# Altium PCB Copy of TQ210_BOARD_V4-20121031.PcbDoc (part 2 of 8)
Units mm, origin at the board's own origin, x right, y up, seen from the top; angles counter-clockwise.
Board outline 191.2 x 131.27 mm, 2 copper layers (TopLayer, BottomLayer); 362 components, 455 nets, 1594 pads, 630 vias.
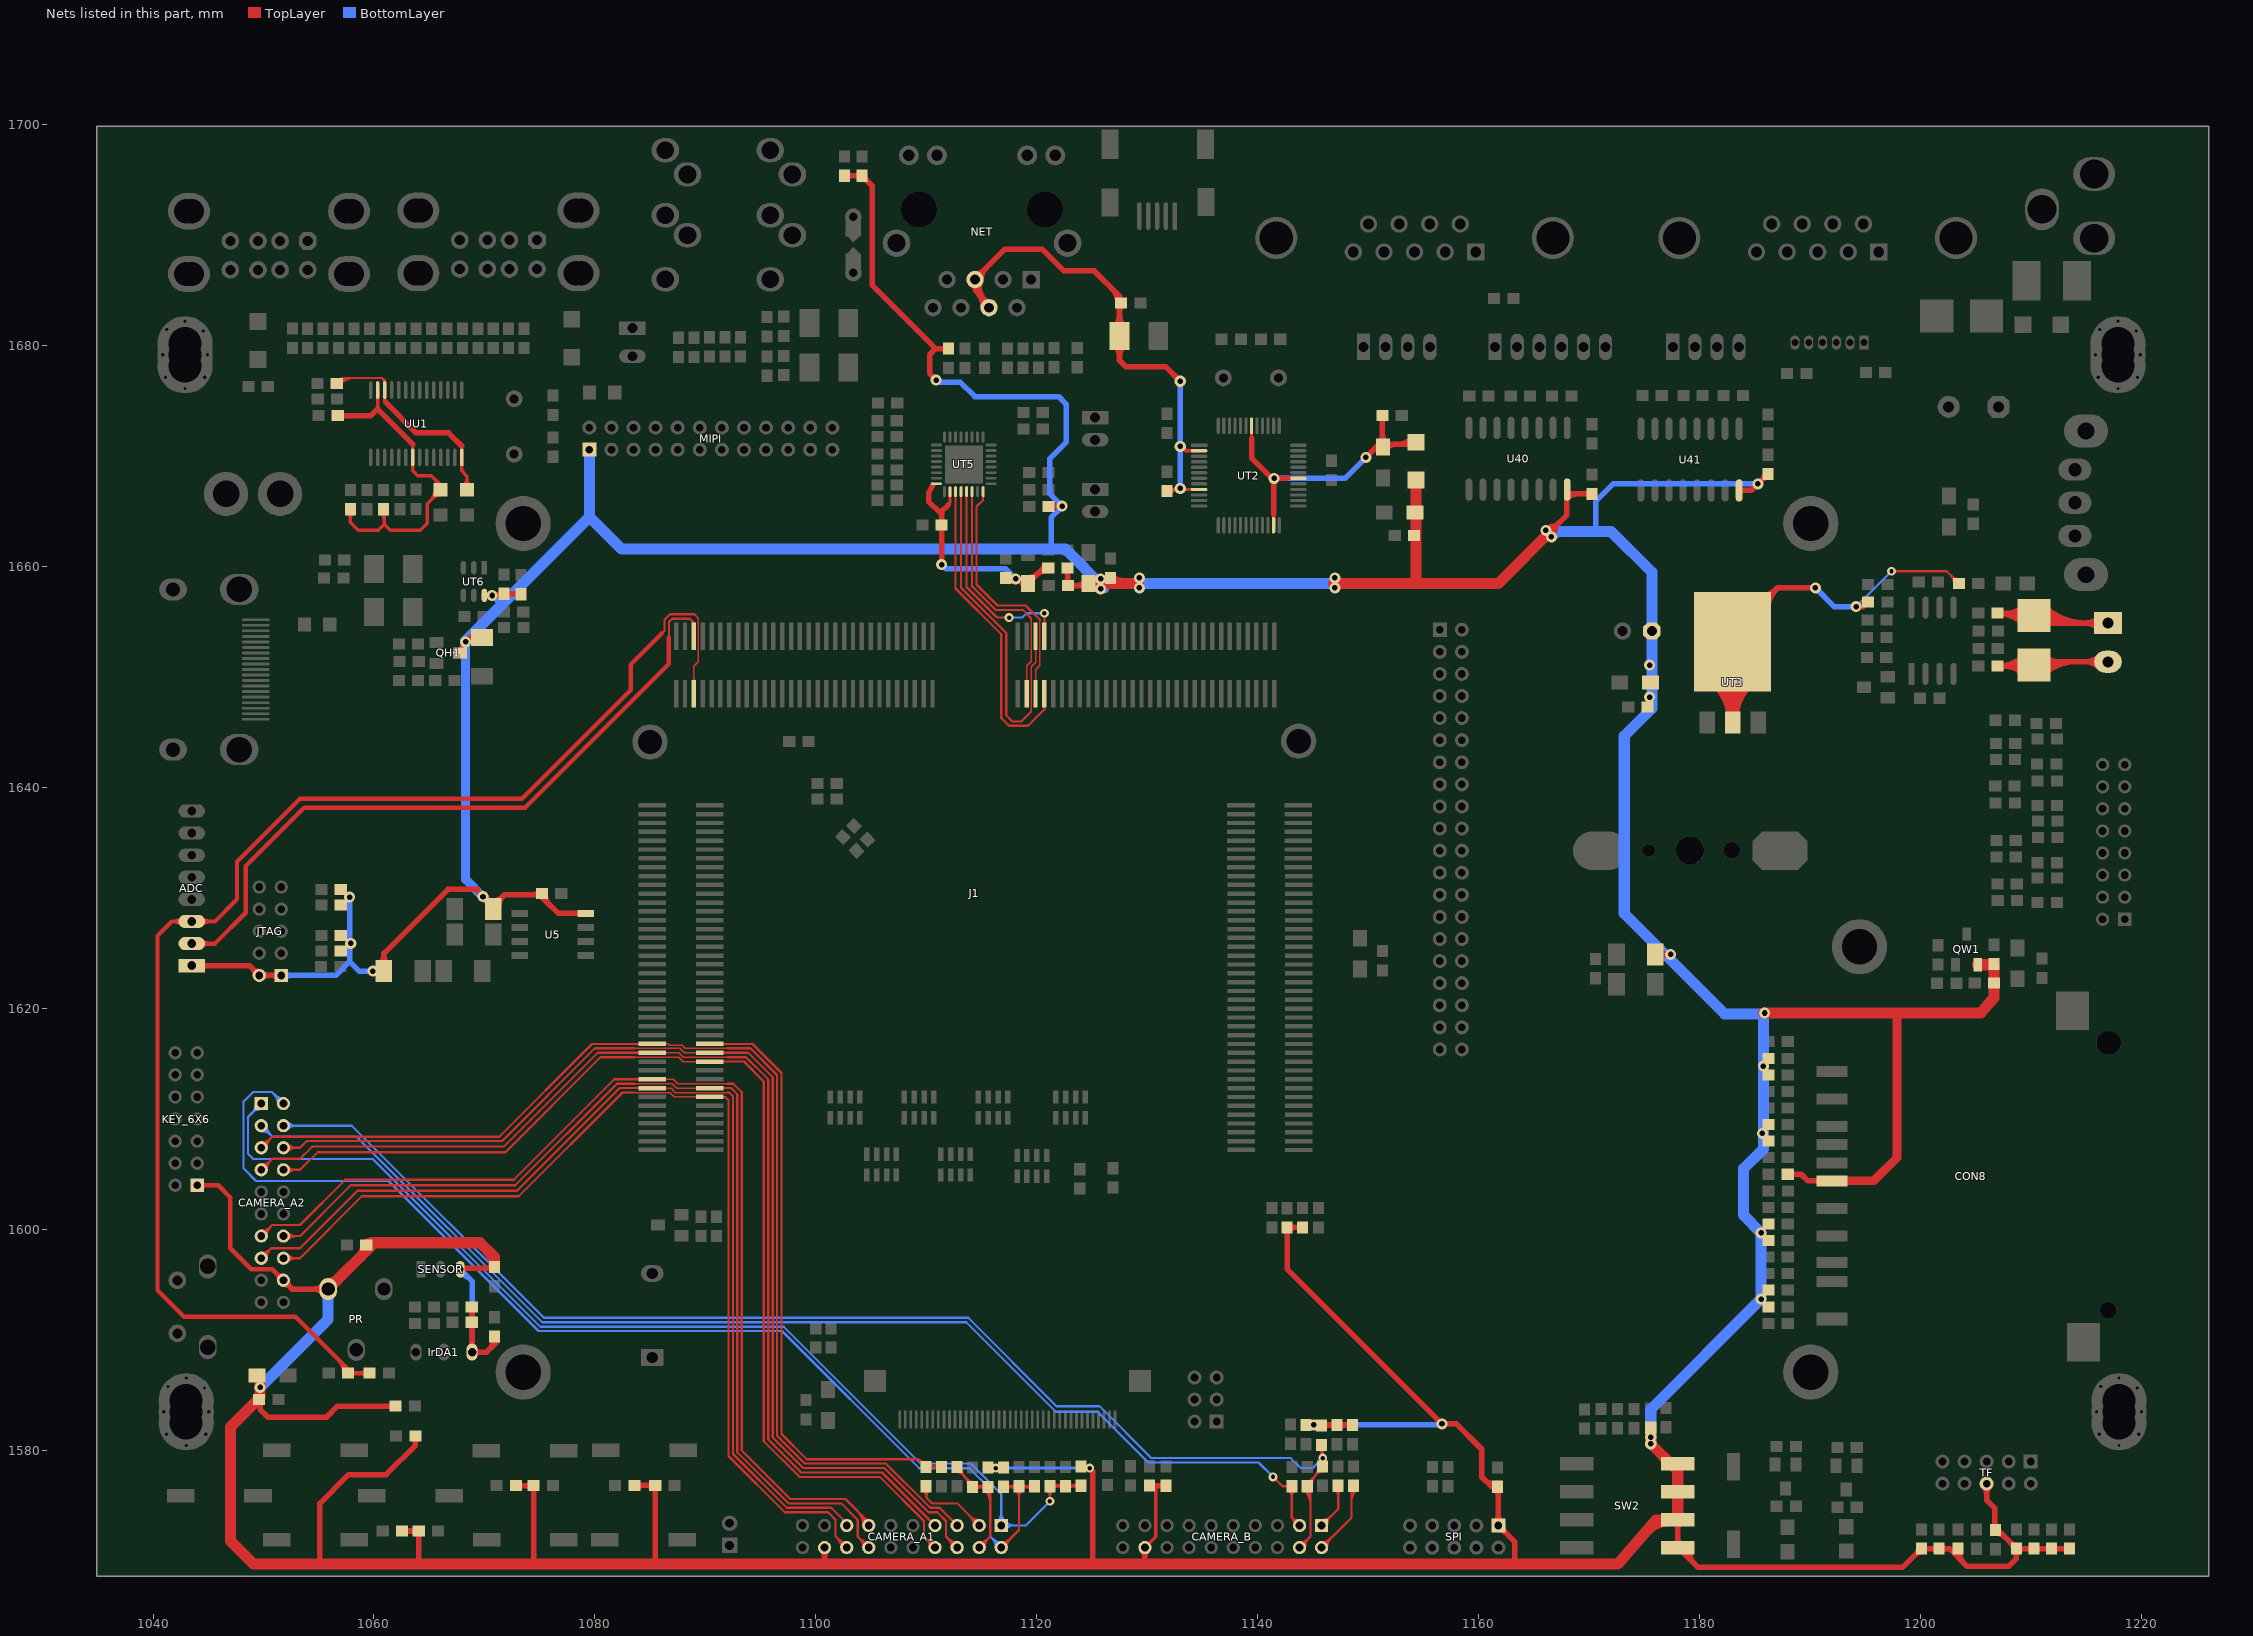
[diagram p2: the nets of this part, all layers, seen from the top]

## Via types
v1: diameter 1, hole 0.5, TopLayer to BottomLayer, 458 vias
v2: diameter 0.8, hole 0.4, TopLayer to BottomLayer, 172 vias

## Nets (pads, with @x,y where several pads share a name; then routed paths per layer and width w, separated by ;. In a path a pad name is that pad's centre, name@x,y a point inside that pad or via, vN(x,y) a via of type N, cw(c..) or ccw(c..) an arc to the next point about the centre after c; other vN are vias at no path point)
1V8_HUB: CU1.1 CU3.2 UU1.12 UU1.28 | length 25.5
  TopLayer w0.2: CU3.2@1056.54,1676.743 cw(c1057.406,1675.877) 1057.406,1677.102 ; CU3.2@1056.631,1676.602 1057.132,1677.102 1060.73,1677.102 1060.965,1676.867 ; CU3.2@1056.681,1676.602 cw(c1057.889,1675.395) 1057.889,1677.102 ; CU3.2@1056.823,1676.46 cw(c1058.372,1674.912) 1058.372,1677.102 ; 1060.726,1677.105 cw(c1060.271,1676.65) UU1.12@1060.915,1676.65 ; 1060.959,1674.943 1060.965,1674.949
  TopLayer w0.3: 1060.965,1674.949 UU1.12@1060.965,1676 1060.965,1676.867 ; 1067.95,1668.688 1068.419,1668.219 CU1.1@1068.419,1666.973 ; UU1.28@1067.95,1669.904 1067.95,1670.949 ; CU1.1@1068.1,1667.291 ccw(c1067.332,1668.059) 1068.419,1668.059 ccw(c1069.505,1668.059) CU1.1@1068.737,1667.291
  TopLayer w0.33: 1067.95,1668.688 UU1.28@1067.95,1669.904
  TopLayer w0.5: 1061.06,1674.917 1063.795,1672.131 1066.767,1672.131 1067.95,1670.949
3V3_HUB: CU2.1 CU5.1 RU18.2 RU19.2 UU1.13 UU1.21 | length 36.1
  TopLayer w0.3: RU18.2@1057.618,1664.911 cw(c1057.02,1664.313) 1057.865,1664.313 cw(c1058.71,1664.313) RU18.2@1058.112,1664.911 ; RU18.2@1057.865,1665.208 1057.865,1664.041 1058.596,1663.31 1060.374,1663.31 1060.933,1663.868 ; 1060.33,1674.289 UU1.13@1060.33,1676 ; RU19.2@1060.618,1664.911 cw(c1059.855,1664.148) 1060.933,1664.148 ; 1060.933,1664.478 cw(c1061.545,1664.478) RU19.2@1061.112,1664.911 ; RU19.2@1060.933,1665.316 1060.933,1663.868 ; 1063.505,1671.114 1063.505,1668.695 1063.95,1668.25 1065.2,1668.25 CU5.1@1065.95,1667.5 ; 1065.111,1665.996 ccw(c1064.13,1666.978) CU5.1@1065.518,1666.978 ; 1065.413,1666.298 cw(c1065.968,1665.743) CU5.1@1065.968,1666.528 ; 1065.421,1668.029 cw(c1064.457,1667.065) CU5.1@1065.818,1666.986 ; CU5.1@1066.056,1666.942 1064.828,1665.714 1064.828,1663.945 1064.193,1663.31 1061.492,1663.31 1060.933,1663.868
  TopLayer w0.5: CU2.1@1056.651,1673.657 1059.698,1673.657 1060.33,1674.289 1063.505,1671.114 ; CU2.1@1056.945,1673.521 cw(c1057.273,1673.194) 1057.273,1673.657 ; CU2.1@1056.945,1673.875 ccw(c1057.471,1674.401) 1057.471,1673.657
3V3_IO: ADC.1 C1.1 C3.1 C5.1 C6.1 C8.1 C9.1 C10.1 C11.1 C12.1 C15.1 C17.1 C111.1 C201.1 C202.1 C403.1 C413.1 C501.1 C517.1 C518.1 CAMERA_A1.18 CAMERA_A2.18 CAMERA_B.18 CM1.1 CM3.1 CMB1.1 CON8.4 D2.1 D3.1 D5.2 D7.2 IrDA1.3 JTAG.1 JTAG.2 KEY_6X6.1 L201.1 L421.1 L501.1 L503.2 L507.2 MIPI.1 PR.3 QH1.C QW1.2 R1.2 R2.2 R3.2 R4.2 R5.2 R6.2 R7.2 R8.2 R33.1 R61.1 R62.1 R63.1 R64.1 R210.1 R211.1 R331.1 RA3.2 RA5.2 RD1.1 RD2.1 RD3.1 RD4.1 RD5.1 RD6.1 RD7.1 RM19.1 RM20.1 RM23.1 RMB19.1 RMB20.1 RMB23.2 RO7.2 RO8.2 RS1.1 RS2.1 RS3.1 RS4.1 RS5.1 RS6.1 RS7.1 RS8.1 RT2.2 RT61.2 RW20.1 RW21.2 SENSOR.3 SPI.1 SW2.5 SW2.6 SW2.7 SW2.8 TF.6 U5.8 U40.16 U41.16 UT3.2 UT3.4 UT6.6 | length 1041.7
  TopLayer w0.2: v2(1197.4,1659.6) 1202.403,1659.6 R331.1@1203.498,1658.505 ; 1202.73,1659.274 cw(c1201.962,1658.505) R331.1@1203.048,1658.505 ; 1202.851,1659.153 ccw(c1203.448,1659.75) R331.1@1203.448,1658.905 ; R331.1@1203.071,1658.932 cw(c1202.645,1658.505) R331.1@1203.248,1658.505
  TopLayer w0.3: KEY_6X6.1@1044.318,1603.682 cw(c1045.086,1602.914) 1045.086,1604 cw(c1045.086,1605.086) KEY_6X6.1@1044.318,1604.318 ; CAMERA_A2.18@1051.35,1595.4 ccw(c1050.264,1595.4) 1051.032,1596.168 ccw(c1051.8,1596.936) CAMERA_A2.18@1051.8,1595.85 ; CAMERA_B.18@1129.8,1571.2 1130.783,1572.183 1130.783,1576.8
  TopLayer w0.4: KEY_6X6.1@1044,1604 1045.9,1604 1047,1602.9 1047,1598.3 1048.9,1596.4 1050.7,1596.4 ; 1050.8,1596.4 CAMERA_A2.18@1051.8,1595.4
  TopLayer w0.5: ADC.1@1043.502,1623.888 1048.728,1623.888 JTAG.2@1049.612,1623.004 ; ADC.1@1044.349,1623.64 cw(c1044.947,1623.043) 1044.947,1623.888 cw(c1044.947,1624.733) ADC.1@1044.349,1624.135 ; JTAG.2@1049.262,1623.004 ccw(c1048.417,1623.004) 1049.015,1623.601 ccw(c1049.612,1624.199) JTAG.2@1049.612,1623.354 ; C5.1@1049.473,1584.423 cw(c1048.926,1583.876) 1049.7,1583.876 ; JTAG.2@1049.612,1623 JTAG.1@1051.7,1623 ; C5.1@1049.7,1584.8 1049.7,1583.7 1050.4,1583 1055.7,1583 1056.711,1584.011 R3.2@1061.992,1584.011 ; JTAG.2@1049.859,1622.756 cw(c1050.448,1622.167) 1050.448,1623 ; JTAG.2@1049.859,1623.251 ccw(c1050.466,1623.857) 1050.466,1623 ; 1050.758,1623 ccw(c1050.758,1623.857) JTAG.1@1051.365,1623.251 ; 1050.776,1623 cw(c1050.776,1622.167) JTAG.1@1051.365,1622.756 ; CAMERA_A2.18@1051.8,1595.05 cw(c1051.8,1594.205) 1052.397,1594.803 cw(c1052.995,1595.4) CAMERA_A2.18@1052.15,1595.4 ; CAMERA_A2.18@1051.8,1595.4 1052.6,1594.6 PR.3@1055.852,1594.6 ; 1055.1,1569.7 1055.1,1575.2 1057.7,1577.8 1061.1,1577.8 1063.75,1580.45 R1.2@1063.75,1581.3 ; PR.3@1055.463,1594.211 ccw(c1054.524,1593.272) 1054.524,1594.6 ccw(c1054.524,1595.928) PR.3@1055.463,1594.989 ; D5.2@1060.546,1624.004 ccw(c1059.693,1624.857) 1060.9,1624.857 ccw(c1062.107,1624.857) D5.2@1061.254,1624.004 ; D5.2@1060.9,1623.4 1060.9,1625 1066.7,1630.8 1069.3,1630.8 1070.8,1629.3 1071.8,1630.3 1075,1630.3 1076.688,1628.612 U5.8@1079.194,1628.612 ; 1061.27,1584.011 cw(c1061.27,1583.37) R3.2@1061.723,1583.823 ; 1061.323,1584.011 ccw(c1061.323,1584.577) R3.2@1061.723,1584.177 ; R2.2@1062.55,1572.7 R4.2@1064.05,1572.7 1064.05,1569.7 ; R2.2@1062.777,1572.523 cw(c1063.204,1572.096) 1063.204,1572.7 cw(c1063.204,1573.304) R2.2@1062.777,1572.877 ; R1.2@1063.573,1581.123 cw(c1063.146,1580.696) 1063.75,1580.696 cw(c1064.354,1580.696) R1.2@1063.927,1581.123 ; R4.2@1063.823,1572.523 ccw(c1063.396,1572.096) 1063.396,1572.7 ccw(c1063.396,1573.304) R4.2@1063.823,1572.877 ; R4.2@1063.873,1572.523 cw(c1063.446,1572.096) 1064.05,1572.096 cw(c1064.654,1572.096) R4.2@1064.227,1572.523 ; QH1.C@1067.782,1652.401 ccw(c1067.376,1653) v1@1068.1,1653 ; SENSOR.3@1067.808,1596.4 1067.908,1596.5 1070.145,1596.5 ; SENSOR.3@1067.914,1596.294 cw(c1068.412,1595.796) 1068.412,1596.5 ; QH1.C@1068.1,1652.1 v1@1068.1,1653 ; v1@1068.275,1653.175 cw(c1068.775,1652.675) D2.1@1069.229,1653.217 ; v1@1068.334,1653.234 cw(c1069.283,1652.284) 1069.55,1653.6 ccw(c1069.127,1653.095) 1068.661,1653.561 ; IrDA1.3@1068.698,1589.336 ccw(c1068.257,1589.777) 1068.88,1589.777 ccw(c1069.503,1589.777) IrDA1.3@1069.062,1589.336 ; RA3.2@1068.723,1591.423 cw(c1068.345,1591.045) 1068.88,1591.045 ; RA3.2@1068.723,1591.777 ccw(c1068.345,1592.155) 1068.88,1592.155 ; RA5.2@1068.723,1592.823 cw(c1068.345,1592.445) 1068.88,1592.445 ; RA5.2@1068.85,1593 1068.88,1592.97 IrDA1.3@1068.88,1588.9 ; 1068.88,1590.948 cw(c1069.552,1590.948) RA3.2@1069.077,1591.423 ; 1068.88,1592.252 ccw(c1069.552,1592.252) RA3.2@1069.077,1591.777 ; 1068.88,1592.348 cw(c1069.552,1592.348) RA5.2@1069.077,1592.823 ; IrDA1.3@1069,1588.9 1070.2,1588.9 1070.9,1589.6 CM1.1@1070.9,1590.3 ; IrDA1.3@1069.062,1588.718 cw(c1069.503,1588.277) 1069.503,1588.9 cw(c1069.503,1589.523) IrDA1.3@1069.062,1589.082 ; D2.1@1069.113,1653.357 ccw(c1068.7,1653.128) 1068.7,1653.6 ; D2.1@1069.113,1653.843 cw(c1068.7,1654.072) 1068.7,1653.6 ; D2.1@1069.8,1653.6 1068.7,1653.6 ; v1@1069.911,1630.189 cw(c1068.972,1629.25) D7.2@1070.3,1629.25 ; UT6.6@1069.995,1657.412 RT61.2@1071.588,1657.412 ; v1@1070.032,1630.068 ccw(c1070.8,1630.836) 1070.8,1629.75 ccw(c1070.8,1630.836) 1071.568,1630.068 ; 1070.525,1589.225 ccw(c1069.963,1589.787) CM1.1@1070.676,1590.139 ; C501.1@1070.6,1596.4 C501.1@1070.7,1596.3 ; CM1.1@1070.723,1590.073 cw(c1070.296,1589.646) 1070.9,1589.646 cw(c1071.504,1589.646) CM1.1@1071.077,1590.073 ; v1@1070.948,1657.412 ccw(c1070.948,1658.35) RT61.2@1071.612,1657.687 ; 1071.018,1589.718 ccw(c1070.623,1590.113) CM1.1@1071.124,1590.361 ; D7.2@1071.3,1629.25 cw(c1072.628,1629.25) 1071.689,1630.189 ; RT61.2@1071.789,1657.56 CM3.1@1073.253,1657.56 ; RT61.2@1071.965,1657.383 cw(c1072.392,1656.956) 1072.392,1657.56 cw(c1072.392,1658.164) RT61.2@1071.965,1657.737 ; 1072.697,1657.56 ccw(c1072.697,1658.166) CM3.1@1073.125,1657.737 ; 1072.7,1657.56 cw(c1072.7,1656.959) CM3.1@1073.125,1657.384 ; R5.2@1072.85,1576.8 R6.2@1074.45,1576.8 1074.45,1569.7 ; R5.2@1073.077,1576.623 cw(c1073.504,1576.196) 1073.504,1576.8 cw(c1073.504,1577.404) R5.2@1073.077,1576.977 ; R6.2@1074.223,1576.623 ccw(c1073.796,1576.196) 1073.796,1576.8 ccw(c1073.796,1577.404) R6.2@1074.223,1576.977 ; R6.2@1074.273,1576.623 cw(c1073.846,1576.196) 1074.45,1576.196 cw(c1075.054,1576.196) R6.2@1074.627,1576.623 ; 1074.305,1630.3 ccw(c1074.305,1631.245) C9.1@1074.973,1630.577 ; C9.1@1075.5,1630.4 ccw(c1076.949,1630.4) 1075.924,1629.376 ; R7.2@1083.574,1576.824 R8.2@1085.474,1576.824 1085.474,1569.7 ; R7.2@1083.801,1576.647 cw(c1084.228,1576.22) 1084.228,1576.824 cw(c1084.228,1577.428) R7.2@1083.801,1577.001 ; R8.2@1085.247,1576.647 ccw(c1084.82,1576.22) 1084.82,1576.824 ccw(c1084.82,1577.428) R8.2@1085.247,1577.001 ; R8.2@1085.297,1576.647 cw(c1084.87,1576.22) 1085.474,1576.22 cw(c1086.078,1576.22) R8.2@1085.651,1576.647 ; CAMERA_A1.18@1100.553,1570.953 cw(c1099.955,1570.355) 1100.8,1570.355 cw(c1101.645,1570.355) CAMERA_A1.18@1101.047,1570.953 ; 1100.8,1569.9 CAMERA_A1.18@1100.8,1571.2 ; R210.1@1102.6,1695.4 R211.1@1103.9,1695.4 ; R210.1@1102.777,1695.223 cw(c1103.204,1694.796) 1103.204,1695.4 cw(c1103.204,1696.004) R210.1@1102.777,1695.577 ; R211.1@1104.023,1695.223 ccw(c1103.596,1694.796) 1103.596,1695.4 ccw(c1103.596,1696.004) R211.1@1104.023,1695.577 ; R211.1@1104.2,1695.1 cw(c1104.2,1694.376) 1104.712,1694.888 ; R211.1@1104.2,1695.4 1105.1,1694.5 1105.1,1685.5 1110.85,1679.75 ; R211.1@1104.45,1695.35 ccw(c1104.933,1695.35) R211.1@1104.591,1695.009 ; v1(1110.9,1676.9) 1110.3,1677.5 1110.3,1679.2 1110.85,1679.75 ; L503.2@1111.823,1679.573 ccw(c1111.396,1679.146) 1111.396,1679.75 ccw(c1111.396,1680.354) L503.2@1111.823,1679.927 ; L503.2@1112,1679.75 1110.85,1679.75 ; L507.2@1121.078,1665.476 v1@1122.324,1665.476 ; L507.2@1121.305,1665.299 cw(c1121.731,1664.872) 1121.731,1665.476 cw(c1121.731,1666.08) L507.2@1121.305,1665.653 ; RT2.2@1122.623,1658.477 ccw(c1122.196,1658.904) 1122.8,1658.904 ccw(c1123.404,1658.904) RT2.2@1122.977,1658.477 ; L501.1@1122.623,1659.723 cw(c1122.196,1659.296) 1122.8,1659.296 cw(c1123.404,1659.296) L501.1@1122.977,1659.723 ; RT2.2@1122.8,1658.35 L501.1@1122.8,1659.9 ; RT2.2@1122.85,1658.3 C517.1@1124.7,1658.3 ; RT2.2@1123.077,1658.123 cw(c1123.504,1657.696) 1123.504,1658.3 cw(c1123.504,1658.904) RT2.2@1123.077,1658.477 ; 1123.594,1658.3 ccw(c1123.594,1659.479) C517.1@1124.428,1658.645 ; 1123.947,1658.3 cw(c1123.947,1657.62) C517.1@1124.428,1658.101 ; RM20.1@1124,1578.4 v2(1124.8,1578.4) 1125.1,1578.1 1125.1,1569.7 ; CAMERA_B.18@1129.553,1570.953 cw(c1128.955,1570.355) 1129.8,1570.355 cw(c1130.645,1570.355) CAMERA_B.18@1130.047,1570.953 ; 1129.7,1569.9 1129.8,1570 CAMERA_B.18@1129.8,1571.2 ; C11.1@1130.22,1576.8 R33.1@1131.7,1576.8 ; R33.1@1131.523,1576.623 ccw(c1131.096,1576.196) 1131.096,1576.8 ccw(c1131.096,1577.404) R33.1@1131.523,1576.977 ; RO8.2@1142.501,1599.945 cw(c1142.075,1599.518) 1142.678,1599.518 cw(c1143.282,1599.518) RO8.2@1142.855,1599.945 ; RO8.2@1142.678,1600.172 1142.678,1596.422 v1(1156.7,1582.4) ; RO8.2@1142.7,1600.2 RO7.2@1143.778,1600.172 ; RO8.2@1142.85,1599.991 cw(c1143.333,1599.482) 1143.351,1600.183 ; RO8.2@1142.86,1600.344 ccw(c1143.226,1600.693) 1143.213,1600.187 ; C8.1@1144.395,1582.311 1145.795,1582.311 1145.805,1582.3 RMB19.1@1148.8,1582.3 ; C8.1@1144.571,1582.134 cw(c1144.998,1581.707) 1144.998,1582.311 cw(c1144.998,1582.914) C8.1@1144.571,1582.487 ; v1@1145.171,1582.311 cw(c1145.171,1581.671) RMB23.2@1145.623,1582.123 ; v1@1145.222,1582.311 ccw(c1145.222,1582.878) RMB23.2@1145.623,1582.477 ; RMB23.2@1145.977,1582.123 cw(c1146.404,1581.696) 1146.404,1582.3 cw(c1146.404,1582.904) RMB23.2@1145.977,1582.477 ; RMB20.1@1147.023,1582.123 ccw(c1146.596,1581.696) 1146.596,1582.3 ccw(c1146.596,1582.904) RMB20.1@1147.023,1582.477 ; RMB20.1@1147.377,1582.123 cw(c1147.804,1581.696) 1147.804,1582.3 cw(c1147.804,1582.904) RMB20.1@1147.377,1582.477 ; RMB19.1@1148.423,1582.123 ccw(c1147.996,1581.696) 1147.996,1582.3 ccw(c1147.996,1582.904) RMB19.1@1148.423,1582.477 ; L201.1@1153.992,1667.486 cw(c1153.118,1666.612) 1154.354,1666.612 cw(c1155.59,1666.612) L201.1@1154.716,1667.486 ; C202.1@1154.039,1662.647 cw(c1153.277,1661.885) 1154.354,1661.885 ; C202.1@1154.039,1663 ccw(c1153.277,1663.762) 1154.354,1663.762 ; C201.1@1154.12,1664.651 cw(c1153.556,1664.087) 1154.354,1664.087 ; C201.1@1154.12,1665.196 ccw(c1153.556,1665.76) 1154.354,1665.76 ; 1154.354,1658.546 1154.4,1658.5 ; 1154.354,1663.901 cw(c1155.415,1663.901) C201.1@1154.665,1664.651 ; 1154.354,1665.946 ccw(c1155.415,1665.946) C201.1@1154.665,1665.196 ; v1@1156.7,1582.3 v1(1156.7,1582.4) ; 1160.585,1577.315 ccw(c1161.403,1578.132) C12.1@1161.655,1577.004 ; C12.1@1161.515,1576.554 ccw(c1161.19,1576.294) 1161.19,1576.71 ; C12.1@1161.515,1576.866 cw(c1161.19,1577.126) 1161.19,1576.71 ; SPI.1@1161.527,1573.471 ccw(c1160.844,1574.151) 1161.807,1574.154 ; C12.1@1161.534,1576.483 cw(c1160.891,1575.836) 1161.803,1575.839 ; C12.1@1161.71,1576.71 1161.19,1576.71 ; SPI.1@1161.8,1572.815 cw(c1161.8,1571.886) 1162.457,1572.543 cw(c1163.114,1573.2) SPI.1@1162.185,1573.2 ; C12.1@1161.8,1576.8 1161.81,1573.19 1163.3,1571.7 1163.3,1569.8 ; 1161.807,1574.105 ccw(c1162.703,1574.108) SPI.1@1162.071,1573.473 ; 1166.7,1663.4 1168,1664.7 U40.16@1168,1666.9 ; U40.16@1168.067,1666.239 cw(c1168.938,1665.369) 1168.938,1666.6 ; U40.16@1168.1,1666.6 C403.1@1170.3,1666.6 ; C403.1@1170.123,1666.423 ccw(c1169.696,1665.996) 1169.696,1666.6 ccw(c1169.696,1667.204) C403.1@1170.123,1666.777 ; D3.1@1176,1624.9 v1(1177.4,1624.9) ; D3.1@1176.354,1624.546 cw(c1177.207,1623.693) 1177.207,1624.9 cw(c1177.207,1626.107) D3.1@1176.354,1625.254 ; SW2.8@1177.722,1578.478 1178.044,1578.156 ; SW2.5@1177.797,1571.427 ccw(c1177.199,1572.025) 1178.044,1572.025 ccw(c1178.889,1572.025) SW2.5@1178.291,1571.427 ; SW2.6@1177.797,1573.473 cw(c1177.199,1572.875) 1178.044,1572.875 cw(c1178.889,1572.875) SW2.6@1178.291,1573.473 ; SW2.5@1177.9,1571.662 ccw(c1178.163,1571.541) SW2.5@1177.958,1571.336 ; SW2.5@1178.044,1571.18 SW2.6@1178.044,1573.7 ; SW2.5@1178.044,1571.25 1179.894,1569.4 1198.4,1569.4 RD1.1@1200.1,1571.1 1202.65,1571.1 1204.25,1569.5 1208,1569.5 1208.7,1570.2 RD4.1@1208.7,1571.1 ; SW2.5@1178.354,1571.452 ccw(c1178.856,1571.22) SW2.5@1178.465,1570.829 ; SW2.5@1178.808,1571.243 ccw(c1179.55,1570.9) 1178.972,1570.322 ; SW2.5@1179.262,1571.033 ccw(c1180.244,1570.58) 1179.479,1569.815 ; U41.16@1183.6,1666.912 1184.712,1666.912 C413.1@1186.2,1668.4 ; UT3.4@1183.654,1656.353 ccw(c1184.314,1658.527) UT3.4@1185.92,1656.92 ; UT3.4@1183.799,1656.831 ccw(c1184.589,1659.432) 1186.51,1657.51 ; UT3.4@1183.944,1657.31 ccw(c1184.863,1660.336) 1187.1,1658.1 ccw(c1189.54,1655.66) UT3.4@1186.172,1654.908 ; UT3.4@1185.684,1654.799 cw(c1188.488,1655.425) UT3.4@1186.456,1657.456 ; 1185.688,1667.888 cw(c1186.2,1667.376) C413.1@1186.2,1668.1 ; C413.1@1185.809,1668.009 ccw(c1185.467,1668.35) C413.1@1185.95,1668.35 ; UT3.4@1186,1657 1187.1,1658.1 v1(1190.5,1658.1) ; C3.1@1188,1605 1189.229,1605 1189.824,1604.405 CON8.4@1191.995,1604.405 ; C3.1@1188.227,1604.823 cw(c1188.654,1604.396) 1188.654,1605 cw(c1188.654,1605.604) C3.1@1188.227,1605.177 ; CON8.4@1190.918,1604.228 ccw(c1190.491,1603.801) 1190.491,1604.405 ccw(c1190.491,1605.009) CON8.4@1190.918,1604.582 ; L421.1@1195.005,1656.906 cw(c1194.2,1657.293) v1(1194.2,1656.4) 1194.8,1656.4 L421.1@1195.2,1656.8 ; 1199.588,1570.588 cw(c1200.1,1570.076) RD1.1@1200.1,1570.8 ; RD1.1@1199.709,1570.709 ccw(c1199.367,1571.05) RD1.1@1199.85,1571.05 ; RD1.1@1200.277,1570.923 cw(c1200.704,1570.496) 1200.704,1571.1 cw(c1200.704,1571.704) RD1.1@1200.277,1571.277 ; RD2.1@1201.523,1570.923 ccw(c1201.096,1570.496) 1201.096,1571.1 ccw(c1201.096,1571.704) RD2.1@1201.523,1571.277 ; RD2.1@1201.877,1570.923 cw(c1202.304,1570.496) 1202.304,1571.1 cw(c1202.304,1571.704) RD2.1@1201.877,1571.277 ; RD3.1@1203.163,1571.13 ccw(c1203.818,1570.909) 1203.33,1570.42 ; RD3.1@1203.637,1570.97 ccw(c1204.672,1570.622) 1203.9,1569.85 ; TF.6@1205.739,1576.717 cw(c1205.082,1576.059) 1206.011,1576.059 cw(c1206.94,1576.059) TF.6@1206.283,1576.717 ; TF.6@1206.011,1576.989 1206.011,1575.489 1206.75,1574.75 1206.75,1573 1206.8,1573 RD4.1@1208.7,1571.1 ; 1206.072,1623.97 ccw(c1206.072,1624.602) RW21.2@1206.518,1624.155 ; 1206.111,1623.97 cw(c1206.111,1623.395) 1206.518,1623.802 cw(c1206.131,1623.415) 1206.679,1623.415 ; RW20.1@1206.502,1622.482 ccw(c1206.075,1622.909) 1206.679,1622.909 ccw(c1207.282,1622.909) RW20.1@1206.855,1622.482 ; RW21.2@1206.637,1623.97 RW21.2@1206.679,1623.929 ; 1206.679,1623.335 cw(c1207.338,1623.335) RW21.2@1206.872,1623.802 ; RW21.2@1206.679,1624.012 RW21.2@1206.695,1624.029 ; 1206.75,1573.574 ccw(c1207.524,1573.574) C6.1@1206.977,1573.027 ; C6.1@1206.8,1572.5 cw(c1206.8,1571.293) 1207.654,1572.146 ; 1208.188,1571.612 ccw(c1208.7,1572.124) RD4.1@1208.7,1571.4 ; RD4.1@1208.309,1571.491 cw(c1207.967,1571.15) RD4.1@1208.45,1571.15 ; RD4.1@1208.523,1570.873 cw(c1208.096,1570.446) 1208.7,1570.446 cw(c1209.304,1570.446) RD4.1@1208.877,1570.873 ; RD4.1@1208.877,1570.923 cw(c1209.304,1570.496) 1209.304,1571.1 cw(c1209.304,1571.704) RD4.1@1208.877,1571.277 ; RD5.1@1210.123,1570.923 ccw(c1209.696,1570.496) 1209.696,1571.1 ccw(c1209.696,1571.704) RD5.1@1210.123,1571.277 ; RD5.1@1210.477,1570.923 cw(c1210.904,1570.496) 1210.904,1571.1 cw(c1210.904,1571.704) RD5.1@1210.477,1571.277 ; RD6.1@1211.723,1570.923 ccw(c1211.296,1570.496) 1211.296,1571.1 ccw(c1211.296,1571.704) RD6.1@1211.723,1571.277 ; RD6.1@1212.077,1570.923 cw(c1212.504,1570.496) 1212.504,1571.1 cw(c1212.504,1571.704) RD6.1@1212.077,1571.277 ; RD7.1@1213.323,1570.923 ccw(c1212.896,1570.496) 1212.896,1571.1 ccw(c1212.896,1571.704) RD7.1@1213.323,1571.277 ; RD7.1@1213.5,1571.1 RD4.1@1208.7,1571.1 ; v1@1068.1,1653 1068.7,1653.6 ; 1070.145,1596.5 ccw(c1070.145,1597.31) 1070.718,1596.737 cw(c1070.145,1597.31) 1070.145,1596.5 ; v1(1156.7,1582.4) 1158,1582.4 1160.3,1580.1 1160.3,1577.6 1161.19,1576.71
  TopLayer w0.8: CON8.4@1191.9,1604.405 1195.805,1604.405 1197.9,1606.5 1197.9,1619.6
  TopLayer w1: 1047,1571.8 1049.1,1569.7 1172.6,1569.7 1176.1,1573.7 SW2.6@1178,1573.7 ; 1047,1571.9 1047,1582.1 1049.7,1584.8 C15.1@1049.7,1586.9 ; C15.1@1049.443,1586.69 cw(c1048.823,1586.07) v1@1049.7,1586.07 ; PR.3@1055.852,1594.6 1060.052,1598.8 ; PR.3@1055.852,1595.1 ccw(c1055.852,1596.307) 1056.706,1595.454 ; 1058.824,1597.572 ccw(c1057.797,1598.6) CMB1.1@1059.25,1598.6 ; 1070.297,1598.103 cw(c1068.855,1596.661) C501.1@1070.895,1596.661 ; C501.1@1070.895,1596.611 1070.895,1597.505 1069.6,1598.8 1060.052,1598.8 ; C517.1@1124.7,1658.5 v1@1129.2,1658.5 ; v1@1125.614,1658.5 ccw(c1125.614,1660.036) 1126.7,1658.95 ccw(c1127.786,1660.036) 1127.786,1658.5 ; v1@1146.9,1658.5 1161.8,1658.5 1166.7,1663.4 ; 1154.354,1658.546 L201.1@1154.354,1667.848 ; 1175.176,1572.643 cw(c1177.342,1570.748) SW2.6@1177.151,1573.62 ; 1175.519,1573.036 cw(c1176.856,1571.866) SW2.6@1177.129,1573.621 ; C1.1@1175.6,1582.05 v1(1175.6,1580.6) SW2.8@1177.722,1578.478 ; 1176.792,1579.408 cw(c1176.185,1578.8) SW2.8@1177.044,1578.8 ; SW2.6@1178.044,1573.72 1178.044,1578.156 ; UT3.4@1181.116,1649.865 cw(c1177.916,1645.9) UT3.2@1183.011,1645.9 cw(c1188.145,1645.9) UT3.4@1184.898,1649.876 ; UT3.4@1181.744,1650.644 cw(c1179.605,1647.992) 1183.011,1647.992 ; UT3.4@1183,1649.8 1183.011,1649.789 UT3.2@1183.011,1645.9 ; 1183.011,1648.008 cw(c1186.424,1648.008) UT3.4@1184.265,1650.651 ; v1@1185.8,1619.6 1205.5,1619.6 1206.679,1620.979 RW20.1@1206.679,1622.305 RW21.2@1206.679,1624.012 ; QW1.2@1205.206,1623.97 RW21.2@1206.637,1623.97 ; CMB1.1@1059.35,1598.6 cw(c1059.833,1598.117) 1059.833,1598.8 ccw(c1059.833,1598.117) CMB1.1@1059.35,1598.6 ; CMB1.1@1059.35,1598.6 ccw(c1059.521,1599.331) 1060.052,1598.8
  BottomLayer w0.2: v1(1194.2,1656.4) v2(1197.4,1659.6) v2@1197.6,1659.6
  BottomLayer w0.3: v2(1116.3,1578.4) v2(1124.8,1578.4)
  BottomLayer w0.5: JTAG.1@1051.612,1623.004 1056.544,1623.004 1057.8,1624.259 ; JTAG.1@1051.86,1622.756 cw(c1052.457,1622.159) 1052.457,1623.004 cw(c1052.457,1623.849) JTAG.1@1051.86,1623.251 ; v1(1057.8,1630.1) 1057.8,1624.259 ; v1(1059.9,1623.4) 1058.659,1623.4 1057.8,1624.259 ; SENSOR.3@1067.808,1595.9 cw(c1067.808,1594.693) 1068.662,1595.546 ; SENSOR.3@1067.808,1596.4 1068.88,1595.328 IrDA1.3@1068.88,1588.9 ; IrDA1.3@1068.698,1589.336 ccw(c1068.257,1589.777) 1068.88,1589.777 ccw(c1069.503,1589.777) IrDA1.3@1069.062,1589.336 ; v1(1070.7,1657.4) 1071.55,1656.55 ; v1@1111.2,1676.7 1113.1,1676.7 1114.4,1675.4 1122,1675.4 1122.7,1674.7 1122.7,1671.3 1121.2,1669.8 1121.2,1666.6 v1(1122.3,1665.5) ; 1121.3,1661.6 1121.3,1664.452 v1@1122.324,1665.476 ; v1(1145.1,1582.311) v1@1156.689,1582.311 ; v1@1166.4,1663.2 v1@1166.5,1663.2 ; 1170.6,1663.3 1170.6,1665.9 1172.2,1667.5 v1(1185.3,1667.5) ; v1(1190.5,1658.1) 1192.2,1656.4 v1(1194.2,1656.4)
  BottomLayer w0.8: v1(1068.3,1653.2) 1068.3,1631.7 v1@1070,1630
  BottomLayer w1: v1(1049.7,1585.7) 1055.852,1591.852 PR.3@1055.852,1594.6 ; v1@1068.3,1653.3 1079.5,1664.5 ; MIPI.1@1079.5,1670.6 1079.5,1664.5 ; v1@1126.1,1658.1 1122.6,1661.6 1082.4,1661.6 1079.5,1664.5 ; v1@1129.3,1658.5 1147.3,1658.5 ; v1@1166.5,1663.2 1172,1663.2 1175.694,1659.506 1175.694,1647.194 1173.2,1644.7 1173.2,1628.6 1182.3,1619.5 1185.8,1619.5 1185.8,1607.3 1184,1605.5 1184,1601.3 v1(1185.6,1599.7) v1@1185.6,1593.8 ; v1@1166.54,1663.34 1166.59,1663.29 1166.68,1663.2 v1@1166.89,1662.99 ; v1(1175.6,1580.6) 1175.6,1583.7 v1(1185.6,1593.7)
  other v1: 1175.6,1581.2 1185.7,1608.7 1185.8,1614.8 1185.9,1619.6 1057.9,1625.9 1069.871,1630.129 1175.5,1648.2 1175.5,1651.1 1125.8,1658 1129.3,1658.1 1147,1658.1 1125.8,1658.9 1129.3,1659 1147,1659 1166.6,1662.7 1166.1,1663.3
33V_AC97: C519.1 C520.1 C521.1 L501.2 UT5.8 UT5.10 | length 29.8
  TopLayer w0.2: 1110.598,1667.394 UT5.8@1110.928,1667.524
  TopLayer w0.3: 1112,1665.6 1112.153,1665.853 UT5.10@1112.153,1666.799 ; UT5.10@1112.148,1667.115 1112.149,1666.799 1112.153,1666.053
  TopLayer w0.5: 1110.598,1667.394 1110.228,1666.717 1110.228,1665.872 1111.4,1664.8 ; C520.1@1111.223,1663.623 cw(c1110.796,1663.196) 1111.4,1663.196 cw(c1112.004,1663.196) C520.1@1111.577,1663.623 ; C520.1@1111.223,1663.977 ccw(c1110.796,1664.404) 1111.4,1664.404 ccw(c1112.004,1664.404) C520.1@1111.577,1663.977 ; v1(1111.4,1660.2) 1111.4,1665 1112,1665.6 ; C521.1@1117.1,1658.9 1119.6,1658.9 1120.6,1659.9 L501.2@1121.05,1659.9 ; C521.1@1117.377,1659.127 ccw(c1117.924,1659.674) v1@1117.924,1658.9 ; C521.1@1117.611,1658.9 cw(c1117.611,1657.038) C519.1@1118.928,1658.355 ; C519.1@1119.2,1659.012 ccw(c1119.2,1660.248) 1120.074,1659.374 ; C519.1@1119.585,1658.627 cw(c1120.208,1658.627) C519.1@1119.767,1659.067 ; 1119.89,1659.19 cw(c1121,1658.081) L501.2@1121,1659.65
  BottomLayer w0.5: v1(1111.4,1660.2) 1111.78,1659.82 1117.18,1659.82 v1(1118.1,1658.9)
A1: 485.1 D421.2 R429.1 | length 30.9
  TopLayer w0.5: R429.1@1207.227,1655.623 cw(c1207.654,1655.196) 1207.654,1655.8 cw(c1207.654,1656.404) R429.1@1207.227,1655.977 ; 1207.765,1655.8 ccw(c1207.765,1658.135) D421.2@1209.416,1656.484 ; 1208.138,1655.8 cw(c1208.138,1653.615) D421.2@1209.748,1655.093 ; D421.2@1209.379,1654.755 ccw(c1207,1652.57) R429.1@1207,1655.8 1210.1,1655.8 1211,1654.9 485.1@1217,1654.9 ; D421.2@1210.477,1655.777 ccw(c1212.593,1657.893) 1212.593,1654.9 ; D421.2@1210.83,1656.13 ccw(c1213.801,1659.101) 1213.801,1654.9 ; D421.2@1211.184,1654.716 cw(c1211.628,1654.272) D421.2@1211.628,1654.9 ; D421.2@1211.184,1656.484 ccw(c1215.008,1660.308) 1215.008,1654.9 ; 485.1@1216.22,1654.37 ccw(c1214.939,1653.089) 1214.939,1654.9 ccw(c1214.939,1656.711) 485.1@1216.22,1655.43
AC97_BITCLK: J1.145 UT5.12 | length 31.8
  TopLayer w0.135: 1119.497,1646.903 1119.497,1650.942 1119.896,1651.34 J1.145@1119.896,1653.706
  TopLayer w0.2: UT5.12@1113.153,1666.799 1113.153,1658.097 1117.25,1654 1117.25,1646.55 1117.8,1646 1118.6,1646 1119.5,1646.9
AC97_RESETN: J1.148 UT5.11 | length 28.8
  TopLayer w0.2: UT5.11@1112.653,1666.799 1112.653,1658.032 1116.8,1653.884 1116.8,1646.3 1117.5,1645.6 1119.213,1645.6 1120.706,1647.093 J1.148@1120.706,1648.495 ; J1.148@1120.625,1647.385 cw(c1120.429,1647.189) 1120.706,1647.189 ; 1120.706,1647.239 cw(c1120.912,1647.239) J1.148@1120.766,1647.385
AC97_SDI: J1.146 UT5.16 | length 22.6
  TopLayer w0.135: J1.146@1119.896,1648.506 1119.896,1650.678 1120.295,1651.078 1120.295,1655.2
  TopLayer w0.2: UT5.16@1115.153,1666.799 1115.153,1666.053 1114.553,1665.453 1114.553,1658.394 1116.447,1656.5 1118.995,1656.5 1120.295,1655.2
AC97_SDO: J1.144 UT5.14 | length 22.2
  TopLayer w0.135: J1.144@1119.096,1648.506 1119.096,1651.042 1119.497,1651.444 1119.497,1655.335
  TopLayer w0.2: UT5.14@1114.153,1666.799 1114.153,1658.229 1116.281,1656.1 1118.732,1656.1 1119.497,1655.335 ; 1119.497,1655.256 1119.497,1655.303
AC97_SYNC: J1.147 UT5.13 | length 19.4
  TopLayer w0.2: UT5.13@1113.653,1666.799 1113.653,1658.163 1116.416,1655.4 v2(1117.5,1655.4) ; v2(1120.7,1655.8) J1.147@1120.706,1653.695
  BottomLayer w0.2: v2(1117.5,1655.4) 1118.7,1655.4 1119.1,1655.8 v2(1120.7,1655.8) v2@1120.5,1655.6
ADCIN0: ADC.2 J1.85 | length 65.8
  TopLayer w0.2: 1086.7,1653.6 1086.7,1655 1087,1655.3 1088.6,1655.3 1088.975,1654.925 J1.85@1088.975,1653.687 ; 1088.661,1655.239 cw(c1088.168,1654.747) J1.85@1088.865,1654.747
  TopLayer w0.4: ADC.2@1043.502,1625.888 1045.6,1625.888 1048.4,1628.688 1048.4,1632.9 1053.7,1638.2 1073.7,1638.2 1086.7,1651.2 1086.7,1653.6 ; ADC.2@1044.385,1625.605 cw(c1045.067,1624.922) 1045.067,1625.888 cw(c1045.067,1626.853) ADC.2@1044.385,1626.171
ADCIN1: ADC.3 CT6.2 J1.86 RA1.1 | length 134.2
  TopLayer w0.135: J1.86@1088.871,1649.641 ccw(c1088.645,1649.867) 1088.965,1649.867 ccw(c1089.284,1649.867) J1.86@1089.058,1649.641 ; J1.86@1088.965,1648.497 1088.965,1651.013 1089.366,1651.414 1089.366,1655.329 1088.995,1655.7
  TopLayer w0.2: 1086.078,1653.978 1086.3,1654.2 1086.3,1655.2 1086.8,1655.7 1088.995,1655.7
  TopLayer w0.4: ADC.3@1042.619,1627.605 ccw(c1041.936,1626.922) 1041.936,1627.888 ccw(c1041.936,1628.853) ADC.3@1042.619,1628.171 ; ADC.3@1044.385,1627.605 cw(c1045.067,1626.922) 1045.067,1627.888 cw(c1045.067,1628.853) ADC.3@1044.385,1628.171 ; 1056.805,1588.195 cw(c1055.61,1587) CT6.2@1057.3,1587 ; 1057.488,1587.512 cw(c1056.976,1587) CT6.2@1057.7,1587 ; CT6.2@1057.912,1586.788 cw(c1058.424,1586.276) 1058.424,1587 cw(c1058.424,1587.724) CT6.2@1057.912,1587.212 ; RA1.1@1059.338,1586.788 ccw(c1058.826,1586.276) 1058.826,1587 ccw(c1058.826,1587.724) RA1.1@1059.338,1587.212 ; RA1.1@1059.6,1587 1058,1587 1052.9,1592.1 1042.8,1592.1 1040.4,1594.5 1040.4,1626.6 1041.688,1627.888 1045.6,1627.888 1047.6,1629.888 1047.6,1633.3 1053.3,1639 1073.4,1639 1083.244,1648.844 1083.244,1651.144 1086.078,1653.978
AVDD25V: C210.1 C211.2 C212.2 NET.4 NET.5 UT2.2 UT2.9 | length 63.1
  TopLayer w0.2: C211.2@1131.9,1667.1 C211.2@1131.996,1667.004
  TopLayer w0.3: C211.2@1131.996,1667.004 UT2.9@1134.703,1667.004 ; C211.2@1132.047,1666.653 cw(c1132.897,1665.803) v1@1132.897,1667.004 ; C211.2@1132.047,1667.147 ccw(c1132.393,1667.493) 1132.393,1667.004 ; 1133.6,1670.5 UT2.2@1134.703,1670.504
  TopLayer w0.4: v1(1133,1670.9) 1133.6,1670.5
  TopLayer w0.5: NET.5@1114.178,1685.52 cw(c1113.914,1684.997) 1114.5,1684.997 cw(c1115.291,1684.997) NET.5@1114.772,1685.594 ; NET.5@1114.42,1686.537 ccw(c1114.42,1687.718) 1115.255,1686.883 ; NET.5@1114.455,1685.986 ccw(c1115.468,1685.577) 1114.695,1684.805 ; 1114.525,1684.975 cw(c1113.01,1683.46) NET.4@1115.153,1683.46 ; NET.5@1114.918,1685.799 ccw(c1116.23,1685.27) 1115.23,1684.27 ; NET.5@1114.957,1686 cw(c1116.371,1686) 1115.371,1687 ; NET.4@1115.69,1683.46 1115.69,1683.81 1114.5,1685 1114.5,1686.128 1117.142,1688.77 1120.48,1688.77 1122.467,1686.783 1125.217,1686.783 1127.5,1684.5 ; 1126.82,1685.18 cw(c1125.539,1683.9) C212.2@1127.35,1683.9 ; C210.1@1127.048,1680.067 cw(c1125.957,1678.976) 1127.5,1678.976 cw(c1129.043,1678.976) C210.1@1127.952,1680.067 ; C210.1@1127.048,1681.733 ccw(c1125.957,1682.824) 1127.5,1682.824 ccw(c1129.043,1682.824) C210.1@1127.952,1681.733 ; 1127.25,1684.75 cw(c1126.792,1684.292) C212.2@1127.375,1684.009 ; 1127.5,1683.055 cw(c1128.445,1683.055) C212.2@1127.777,1683.723 ; C212.2@1127.723,1684.118 cw(c1127.939,1684.5) 1127.5,1684.5 ; v1(1133,1676.8) 1131.7,1678.1 1128.1,1678.1 1127.5,1678.7 1127.5,1684.5
  BottomLayer w0.5: v1(1133,1667.1) v1(1133,1676.8)
AVDD33V: C203.1 C205.1 L201.2 UT2.23 UT2.30 UT2.42 | length 35.8
  TopLayer w0.3: 1139.453,1671.647 UT2.42@1139.453,1672.754 ; UT2.23@1141.453,1663.754 1141.453,1664.753 ; 1142.404,1668.004 UT2.30@1143.703,1668.004
  TopLayer w0.5: 1139.453,1671.647 1139.453,1669.847 1141.296,1668.004 1142.6,1668.004 ; 1141.453,1664.753 v1@1141.453,1667.747 ; v1(1149.8,1669.9) 1151.051,1671.151 C203.1@1151.251,1671.151 ; 1150.299,1670.399 cw(c1151.354,1669.343) C203.1@1151.354,1670.836 ; C203.1@1151.082,1671.247 ccw(c1150.556,1671.773) 1151.3,1671.773 ; C205.1@1151.123,1673.523 cw(c1150.696,1673.096) 1151.3,1673.096 cw(c1151.904,1673.096) C205.1@1151.477,1673.523 ; 1151.3,1672.035 ccw(c1152.415,1672.035) C203.1@1151.626,1671.247 ; C205.1@1151.3,1673.7 1151.3,1671.2 1151.2,1671.1 L201.2@1154.175,1671.098 ; C203.1@1151.626,1670.702 cw(c1152.585,1669.742) 1152.586,1671.099 ; C203.1@1151.627,1671.247 ccw(c1151.982,1671.602) C203.1@1151.982,1671.099 ; 1152.686,1671.099 ccw(c1152.687,1672.947) L201.2@1153.992,1671.639 ; 1153.55,1671.098 cw(c1153.55,1670.474) L201.2@1153.992,1670.915
  BottomLayer w0.5: v1(1141.5,1668.004) 1147.904,1668.004 v1(1149.8,1669.9)
B1: 485.2 D421.1 R428.1 | length 28.5
  TopLayer w0.5: R428.1@1207,1651 1209.8,1651 1210.2,1651.4 485.2@1217,1651.4 ; R428.1@1207.041,1651 ccw(c1207.041,1654.359) D421.1@1209.416,1651.984 ; R428.1@1207.227,1650.823 cw(c1207.654,1650.396) 1207.654,1651 cw(c1207.654,1651.604) R428.1@1207.227,1651.177 ; R428.1@1207.524,1651 cw(c1207.524,1648.324) D421.1@1209.416,1650.216 ; 1208.248,1651 ccw(c1208.248,1653.152) D421.1@1209.77,1651.63 ; 1208.731,1651 cw(c1208.731,1649.531) D421.1@1209.77,1650.57 ; D421.1@1210.83,1650.57 cw(c1212.835,1648.565) 1212.835,1651.4 ; D421.1@1211.184,1650.216 cw(c1214.042,1647.358) 1214.042,1651.4 ; D421.1@1211.184,1651.984 ccw(c1212.593,1653.393) 1212.593,1651.4 ; 485.2@1216.22,1650.87 ccw(c1214.939,1649.589) 1214.939,1651.4 ccw(c1214.939,1653.211) 485.2@1216.22,1651.93
CAM_CLKOUT: CAMERA_A1.8 CAMERA_A2.8 J1.22 | length 107.6
  TopLayer w0.135: 1083.6,1615.6 1087.6,1615.6 1088,1615.2 J1.22@1090.4,1615.2
  TopLayer w0.2: CAMERA_A2.8@1051.8,1605.4 1053.3,1605.4 1054.9,1607 1071.9,1607 1080.5,1615.6 1083.6,1615.6 ; CAMERA_A2.8@1052.012,1605.188 cw(c1052.524,1604.676) 1052.524,1605.4 cw(c1052.524,1606.124) CAMERA_A2.8@1052.012,1605.612 ; CAMERA_A2.8@1052.154,1605.046 cw(c1053.007,1604.193) 1053.007,1605.4 cw(c1053.007,1606.607) CAMERA_A2.8@1052.154,1605.754 ; J1.22@1090.4,1615.2 1093.507,1615.2 1095.3,1613.407 1095.3,1580.825 1098.525,1577.6 1105.8,1577.6 1109.8,1573.6 1109.8,1572.2 CAMERA_A1.8@1110.8,1571.2 ; CAMERA_A1.8@1110.3,1571.2 ccw(c1109.093,1571.2) 1109.946,1572.054 ccw(c1110.8,1572.907) CAMERA_A1.8@1110.8,1571.7 ; CAMERA_A1.8@1110.5,1571.2 ccw(c1109.776,1571.2) 1110.288,1571.712 ccw(c1110.8,1572.224) CAMERA_A1.8@1110.8,1571.5
CAM_FILELD: J1.26 RM5.1 RM6.1 | length 60.4
  TopLayer w0.2: J1.26@1090.4,1616.8 1094.269,1616.8 1096.9,1614.169 1096.9,1581.488 1099.188,1579.2 1109.3,1579.2 RM5.1@1110,1578.5 RM6.1@1111.4,1578.5 ; 1109.325,1579.175 ccw(c1109.882,1579.732) RM5.1@1109.96,1578.948 ; 1109.353,1579.147 cw(c1108.755,1578.55) RM5.1@1109.6,1578.55 ; RM5.1@1110.283,1578.217 cw(c1110.966,1577.534) 1110.966,1578.5 cw(c1110.966,1579.466) RM5.1@1110.283,1578.783 ; RM6.1@1111.117,1578.217 ccw(c1110.434,1577.534) 1110.434,1578.5 ccw(c1110.434,1579.466) RM6.1@1111.117,1578.783
CAM_HREF: CAMERA_A1.6 CAMERA_A2.6 J1.24 | length 109.4
  TopLayer w0.135: 1083.6,1616.4 1087.7,1616.4 1088.1,1616 J1.24@1090.4,1616
  TopLayer w0.2: CAMERA_A2.6@1051.8,1607.4 1053.3,1607.4 1053.9,1608 1071.6,1608 1080,1616.4 1083.6,1616.4 ; CAMERA_A2.6@1052.012,1607.188 cw(c1052.524,1606.676) 1052.524,1607.4 cw(c1052.524,1608.124) CAMERA_A2.6@1052.012,1607.612 ; CAMERA_A2.6@1052.154,1607.046 cw(c1053.007,1606.193) 1053.007,1607.4 cw(c1053.007,1608.607) CAMERA_A2.6@1052.154,1607.754 ; J1.24@1090.4,1616 1093.875,1616 1096.1,1613.775 1096.1,1581.157 1098.857,1578.4 1106.2,1578.4 1110.2,1574.4 1111,1574.4 1111.8,1573.6 1111.8,1572.2 CAMERA_A1.6@1112.8,1571.2 ; CAMERA_A1.6@1112.3,1571.2 ccw(c1111.093,1571.2) 1111.946,1572.054 ccw(c1112.8,1572.907) CAMERA_A1.6@1112.8,1571.7 ; CAMERA_A1.6@1112.5,1571.2 ccw(c1111.776,1571.2) 1112.288,1571.712 ccw(c1112.8,1572.224) CAMERA_A1.6@1112.8,1571.5
CAM_IO: CAMERA_A1.3 RM5.2 | length 11.4
  TopLayer w0.2: RM5.2@1109.717,1576.417 cw(c1109.034,1575.734) 1110,1575.734 cw(c1110.966,1575.734) RM5.2@1110.283,1576.417 ; RM5.2@1110,1576.75 1110,1575.731 1110.531,1575.2 1112.8,1575.2 CAMERA_A1.3@1114.8,1573.2 ; CAMERA_A1.3@1114.3,1573.2 ccw(c1113.093,1573.2) 1113.946,1574.054 ccw(c1114.8,1574.907) CAMERA_A1.3@1114.8,1573.7 ; CAMERA_A1.3@1114.5,1573.2 ccw(c1113.776,1573.2) 1114.288,1573.712 ccw(c1114.8,1574.224) CAMERA_A1.3@1114.8,1573.5
CAM_PCLK: CAMERA_A1.5 CAMERA_A2.5 J1.25 | length 107.1
  TopLayer w0.135: J1.25@1085.2,1616.8 1086.6,1616.8 1086.734,1616.666 1087.934,1616.666 1088.2,1616.4 1092,1616.4
  TopLayer w0.2: CAMERA_A2.5@1049.8,1607.4 1050.8,1608.4 1071.35,1608.4 1079.75,1616.8 J1.25@1085.2,1616.8 ; CAMERA_A2.5@1049.8,1607.7 ccw(c1049.8,1608.424) 1050.312,1607.912 ccw(c1050.824,1607.4) CAMERA_A2.5@1050.1,1607.4 ; CAMERA_A2.5@1049.8,1607.9 ccw(c1049.8,1609.107) 1050.654,1608.254 ccw(c1051.507,1607.4) CAMERA_A2.5@1050.3,1607.4 ; 1092,1616.4 1094.085,1616.4 1096.5,1613.985 1096.5,1581.323 1099.023,1578.8 1106.366,1578.8 1110.366,1574.8 1111.2,1574.8 CAMERA_A1.5@1112.8,1573.2
CAM_SCL: CAMERA_A1.2 CAMERA_A2.2 RM1.1 RM19.2 RM24.1 | length 121.5
  TopLayer w0.2: CAMERA_A1.2@1116.8,1571.2 1118.4,1572.8 RM24.1@1118.4,1576.748 ; CAMERA_A1.2@1116.8,1571.5 ccw(c1116.8,1572.224) 1117.312,1571.712 ccw(c1117.824,1571.2) CAMERA_A1.2@1117.1,1571.2 ; CAMERA_A1.2@1116.8,1571.7 ccw(c1116.8,1572.907) 1117.654,1572.054 ccw(c1118.507,1571.2) CAMERA_A1.2@1117.3,1571.2 ; RM19.2@1117.005,1576.7 RM1.1@1119.852,1576.7 ; RM19.2@1117.288,1576.417 cw(c1117.971,1575.734) 1117.971,1576.7 cw(c1117.971,1577.666) RM19.2@1117.288,1576.983 ; RM19.2@1117.43,1576.7 cw(c1117.43,1575.728) 1118.117,1576.415 cw(c1117.434,1575.733) 1118.4,1575.733 cw(c1119.366,1575.733) 1118.683,1576.415 cw(c1119.37,1575.728) RM1.1@1119.37,1576.7 ; RM19.2@1117.439,1576.7 ccw(c1117.439,1577.66) RM24.1@1118.117,1576.981 ; RM24.1@1118.683,1576.981 ccw(c1119.361,1577.66) RM1.1@1119.361,1576.7 ; RM24.1@1118.83,1576.7 cw(c1118.83,1575.728) RM1.1@1119.517,1576.415 ; RM24.1@1118.839,1576.7 ccw(c1118.839,1577.66) RM1.1@1119.517,1576.981
  BottomLayer w0.2: CAMERA_A2.2@1051.3,1611.4 ccw(c1050.093,1611.4) 1050.946,1612.254 ccw(c1051.8,1613.107) CAMERA_A2.2@1051.8,1611.9 ; CAMERA_A2.2@1051.5,1611.4 ccw(c1050.776,1611.4) 1051.288,1611.912 ccw(c1051.8,1612.424) CAMERA_A2.2@1051.8,1611.7 ; CAMERA_A2.2@1051.8,1611.4 1050.757,1612.443 1049.071,1612.443 1048.182,1611.554 1048.182,1605.534 1049.325,1604.391 1061.309,1604.391 1074.9,1590.8 1096.945,1590.8 1109.364,1578.381 1113.91,1578.381 1115.771,1576.52 1115.771,1572.229 CAMERA_A1.2@1116.8,1571.2 ; CAMERA_A1.2@1116.3,1571.2 ccw(c1115.093,1571.2) 1115.946,1572.054 ccw(c1116.8,1572.907) CAMERA_A1.2@1116.8,1571.7 ; CAMERA_A1.2@1116.5,1571.2 ccw(c1115.776,1571.2) 1116.288,1571.712 ccw(c1116.8,1572.224) CAMERA_A1.2@1116.8,1571.5
CAM_SDA: CAMERA_A1.1 CAMERA_A2.1 RM3.1 RM20.2 RM25.1 | length 115
  TopLayer w0.2: RM3.1@1120.917,1576.415 cw(c1120.234,1575.733) 1121.2,1575.733 cw(c1122.166,1575.733) RM3.1@1121.483,1576.415 ; v2(1121.2,1575.4) RM3.1@1121.2,1576.748 ; RM3.1@1121.252,1576.8 RM20.2@1124.005,1576.8 ; RM3.1@1121.483,1576.515 cw(c1122.17,1575.828) RM25.1@1122.17,1576.8 ; RM3.1@1121.483,1577.081 ccw(c1122.161,1577.76) RM25.1@1122.161,1576.8 ; RM3.1@1121.63,1576.8 cw(c1121.63,1575.828) RM25.1@1122.317,1576.515 ; RM3.1@1121.639,1576.8 ccw(c1121.639,1577.76) RM25.1@1122.317,1577.081 ; RM25.1@1122.883,1576.515 cw(c1123.57,1575.828) RM20.2@1123.57,1576.8 ; RM25.1@1122.883,1577.081 ccw(c1123.561,1577.76) RM20.2@1123.561,1576.8 ; RM20.2@1123.723,1576.517 ccw(c1123.04,1575.834) 1123.04,1576.8 ccw(c1123.04,1577.766) RM20.2@1123.723,1577.083
  BottomLayer w0.2: CAMERA_A2.1@1049.3,1611.4 cw(c1048.093,1611.4) 1048.946,1610.546 cw(c1049.8,1609.693) CAMERA_A2.1@1049.8,1610.9 ; CAMERA_A2.1@1049.5,1611.4 cw(c1048.776,1611.4) 1049.288,1610.888 cw(c1049.8,1610.376) CAMERA_A2.1@1049.8,1611.1 ; CAMERA_A2.1@1049.8,1611.4 1048.588,1610.188 1048.588,1606.855 1049.071,1606.372 1059.893,1606.372 1075.066,1591.2 1097.111,1591.2 1109.511,1578.8 1114.057,1578.8 1116.8,1576.057 CAMERA_A1.1@1116.8,1573.2 1119,1573.2 v2(1121.2,1575.4) ; CAMERA_A1.1@1116.446,1573.554 ccw(c1115.593,1574.407) 1116.8,1574.407 ccw(c1118.007,1574.407) 1117.154,1573.554 ccw(c1118.007,1574.407) 1118.007,1573.2 ccw(c1118.007,1571.993) CAMERA_A1.1@1117.154,1572.846 ; CAMERA_A1.1@1116.588,1573.412 ccw(c1116.076,1573.924) 1116.8,1573.924 ccw(c1117.524,1573.924) 1117.012,1573.412 ccw(c1117.524,1573.924) 1117.524,1573.2 ccw(c1117.524,1572.476) CAMERA_A1.1@1117.012,1572.988
CAM_VSYNC: CAMERA_A1.7 CAMERA_A2.7 J1.23 | length 105.3
  TopLayer w0.135: J1.23@1085.1,1616 1087.6,1616 1088,1615.6 1092,1615.6
  TopLayer w0.2: CAMERA_A2.7@1049.8,1605.4 1050.8,1606.4 1053.3,1606.4 1054.4,1607.5 1071.75,1607.5 1080.25,1616 J1.23@1085.2,1616 ; CAMERA_A2.7@1049.8,1605.7 ccw(c1049.8,1606.424) 1050.312,1605.912 ccw(c1050.824,1605.4) CAMERA_A2.7@1050.1,1605.4 ; CAMERA_A2.7@1049.8,1605.9 ccw(c1049.8,1607.107) 1050.654,1606.254 ccw(c1051.507,1605.4) CAMERA_A2.7@1050.3,1605.4 ; 1092,1615.6 1093.691,1615.6 1095.7,1613.591 1095.7,1580.991 1098.691,1578 1106,1578 CAMERA_A1.7@1110.8,1573.2
CAMARSTN: CAMERA_A1.4 RM21.2 RM22.2 RM23.2 | length 23.2
  TopLayer w0.2: RM21.2@1112.795,1578.05 cw(c1112.795,1577.433) 1113.231,1577.869 ; RM21.2@1112.795,1578.5 1112.795,1578.305 RM22.2@1114.1,1577 ; RM21.2@1112.995,1578.45 ccw(c1113.826,1578.45) 1113.238,1577.862 ; RM21.2@1113.195,1578.45 ccw(c1114.509,1578.45) 1113.58,1577.52 ; 1113.41,1577.69 cw(c1112.468,1576.748) RM22.2@1113.8,1576.748 ; 1113.751,1577.349 cw(c1113.151,1576.748) RM22.2@1114,1576.748 ; 1113.776,1577.324 ccw(c1114.2,1577.747) RM22.2@1114.2,1577.148 ; RM22.2@1114.2,1576.698 1115.502,1576.698 RM23.2@1115.8,1576.4 ; RM22.2@1114.483,1576.415 cw(c1115.166,1575.733) 1115.166,1576.698 cw(c1115.166,1577.664) RM22.2@1114.483,1576.981 ; CAMERA_A1.4@1114.8,1571.2 1115.8,1572.2 RM23.2@1115.8,1576.8 ; CAMERA_A1.4@1114.8,1571.5 ccw(c1114.8,1572.224) 1115.312,1571.712 ccw(c1115.824,1571.2) CAMERA_A1.4@1115.1,1571.2 ; CAMERA_A1.4@1114.8,1571.7 ccw(c1114.8,1572.907) 1115.654,1572.054 ccw(c1116.507,1571.2) CAMERA_A1.4@1115.3,1571.2 ; RM23.2@1115.317,1576.365 cw(c1114.151,1575.2) 1115.8,1575.2 ; RM23.2@1115.317,1576.415 ccw(c1114.634,1575.733) 1114.634,1576.698 ccw(c1114.634,1577.664) RM23.2@1115.317,1576.981 ; RM23.2@1115.398,1576.7 RM23.2@1115.4,1576.698 ; RM23.2@1115.459,1576.507 cw(c1114.634,1575.683) 1115.8,1575.683 ; RM23.2@1115.6,1576.648 cw(c1115.117,1576.165) 1115.8,1576.165 cw(c1116.083,1576.165) RM23.2@1115.883,1576.365
CAMB_IO: CAMERA_A2.3 CAMERA_B.3 RMB5.2 | length 116.6
  TopLayer w0.2: v2(1141.4,1577.6) 1142.25,1576.75 RMB5.2@1143.1,1576.75 1143.1,1573.9 ; RMB5.2@1142.817,1576.417 cw(c1142.134,1575.734) 1143.1,1575.734 cw(c1144.066,1575.734) RMB5.2@1143.383,1576.417 ; CAMERA_B.3@1143.306,1573.275 ccw(c1142.584,1573.384) 1143.1,1573.9 ; CAMERA_B.3@1143.725,1573.694 cw(c1143.616,1574.416) 1143.1,1573.9 ; CAMERA_B.3@1143.8,1573.2 1143.1,1573.9
  BottomLayer w0.2: CAMERA_A2.3@1049.8,1608.9 cw(c1049.8,1607.693) 1050.654,1608.546 cw(c1051.507,1609.4) CAMERA_A2.3@1050.3,1609.4 ; CAMERA_A2.3@1049.8,1609.1 cw(c1049.8,1608.376) 1050.312,1608.888 cw(c1050.824,1609.4) CAMERA_A2.3@1050.1,1609.4 ; CAMERA_A2.3@1049.8,1609.4 1050.796,1608.404 1058.427,1608.404 1075.231,1591.6 1113.627,1591.6 1121.727,1583.5 1125.5,1583.5 1130.1,1578.9 1140.092,1578.9 v2(1141.4,1577.6)
CAMB_SCL: CAMERA_B.2 RMB1.1 | length 12.7
  TopLayer w0.2: CAMERA_B.2@1145.8,1571.2 1148.5,1573.9 RMB1.1@1148.5,1576.8 ; CAMERA_B.2@1145.8,1571.5 ccw(c1145.8,1572.224) 1146.312,1571.712 ccw(c1146.824,1571.2) CAMERA_B.2@1146.1,1571.2 ; CAMERA_B.2@1145.8,1571.7 ccw(c1145.8,1572.907) 1146.654,1572.054 ccw(c1147.507,1571.2) CAMERA_B.2@1146.3,1571.2 ; RMB1.1@1148.417,1576.467 cw(c1148.217,1576.267) 1148.5,1576.267 cw(c1149.183,1576.267) RMB1.1@1148.7,1576.75 ; 1148.5,1575.301 cw(c1150.149,1575.301) RMB1.1@1148.983,1576.467 ; 1148.5,1575.784 cw(c1149.666,1575.784) RMB1.1@1148.841,1576.609
CAMB_SDA: CAMERA_B.1 RMB3.1 | length 8.8
  TopLayer w0.2: CAMERA_B.1@1145.8,1573.2 1147.3,1574.7 RMB3.1@1147.3,1576.8 ; CAMERA_B.1@1145.8,1573.5 ccw(c1145.8,1574.224) 1146.312,1573.712 ccw(c1146.824,1573.2) CAMERA_B.1@1146.1,1573.2 ; CAMERA_B.1@1145.8,1573.7 ccw(c1145.8,1574.907) 1146.654,1574.054 ccw(c1147.507,1573.2) CAMERA_B.1@1146.3,1573.2 ; RMB3.1@1147.017,1576.467 cw(c1146.334,1575.784) 1147.3,1575.784 cw(c1148.266,1575.784) RMB3.1@1147.583,1576.467
CAMBRSTN: CAMERA_A2.4 CAMERA_B.4 RMB21.2 RMB22.2 RMB23.1 | length 134.9
  TopLayer w0.2: CAMERA_B.4@1143.8,1571.2 1144.8,1572.2 RMB22.2@1144.8,1576.7 ; CAMERA_B.4@1143.8,1571.5 ccw(c1143.8,1572.224) 1144.312,1571.712 ccw(c1144.824,1571.2) CAMERA_B.4@1144.1,1571.2 ; CAMERA_B.4@1143.8,1571.7 ccw(c1143.8,1572.907) 1144.654,1572.054 ccw(c1145.507,1571.2) CAMERA_B.4@1144.3,1571.2 ; RMB22.2@1144.217,1576.417 cw(c1142.81,1575.01) 1144.8,1575.01 ; RMB22.2@1144.359,1576.559 cw(c1143.293,1575.493) 1144.8,1575.493 ; RMB22.2@1144.4,1576.9 1145.9,1578.4 RMB23.1@1145.9,1580.3 ; RMB22.2@1144.5,1576.7 cw(c1143.776,1575.976) 1144.8,1575.976 ; RMB22.2@1144.5,1577.2 ccw(c1144.5,1577.683) 1144.841,1577.341 ; RMB22.2@1144.7,1576.8 cw(c1145.666,1576.8) 1144.983,1577.483 ; RMB22.2@1144.9,1576.8 cw(c1146.349,1576.8) 1145.324,1577.824 ; 1145.146,1577.646 ccw(c1144.293,1578.5) RMB21.2@1145.5,1578.5 ; 1145.388,1577.888 cw(c1145.9,1577.376) RMB21.2@1145.9,1578.1 ; 1145.488,1577.988 ccw(c1144.976,1578.5) RMB21.2@1145.7,1578.5 ; RMB23.1@1145.517,1580.167 cw(c1144.593,1579.243) v2@1145.9,1579.243 ; RMB21.2@1145.617,1578.883 ccw(c1144.934,1579.566) 1145.9,1579.566 ccw(c1146.866,1579.566) RMB21.2@1146.183,1578.883 ; RMB23.1@1145.659,1580.309 cw(c1145.076,1579.726) 1145.9,1579.726 cw(c1146.524,1579.726) RMB23.1@1146.083,1580.167
  BottomLayer w0.2: CAMERA_A2.4@1051.8,1609.4 1057.997,1609.4 1075.397,1592 1113.8,1592 1121.8,1584 1125.7,1584 1130.4,1579.3 1143,1579.3 1143.9,1578.4 1145,1578.4 v2(1145.9,1579.3) ; CAMERA_A2.4@1052.012,1609.188 cw(c1052.524,1608.676) 1052.524,1609.4 cw(c1052.524,1610.124) CAMERA_A2.4@1052.012,1609.612 ; CAMERA_A2.4@1052.154,1609.046 cw(c1053.007,1608.193) 1053.007,1609.4 cw(c1053.007,1610.607) CAMERA_A2.4@1052.154,1609.754
CAMDATA0: CAMERA_A1.16 CAMERA_A2.16 J1.14 | length 100.1
  TopLayer w0.135: 1083.6,1612.4 1086.8,1612.4 1087.2,1612 J1.14@1090.4,1612
  TopLayer w0.2: CAMERA_A2.16@1051.8,1597.4 1053.3,1597.4 1058.9,1603 1073.1,1603 1082.5,1612.4 1083.6,1612.4 ; CAMERA_A2.16@1052.012,1597.188 cw(c1052.524,1596.676) 1052.524,1597.4 cw(c1052.524,1598.124) CAMERA_A2.16@1052.012,1597.612 ; CAMERA_A2.16@1052.154,1597.046 cw(c1053.007,1596.193) 1053.007,1597.4 cw(c1053.007,1598.607) CAMERA_A2.16@1052.154,1597.754 ; J1.14@1090.4,1612 1091.8,1612 1092.1,1611.7 1092.1,1579.5 1097.2,1574.4 1101.1,1574.4 1101.8,1573.7 1101.8,1572.2 CAMERA_A1.16@1102.8,1571.2 ; CAMERA_A1.16@1102.3,1571.2 ccw(c1101.093,1571.2) 1101.946,1572.054 ccw(c1102.8,1572.907) CAMERA_A1.16@1102.8,1571.7 ; CAMERA_A1.16@1102.5,1571.2 ccw(c1101.776,1571.2) 1102.288,1571.712 ccw(c1102.8,1572.224) CAMERA_A1.16@1102.8,1571.5
CAMDATA1: CAMERA_A1.15 CAMERA_A2.15 J1.15 | length 97.7
  TopLayer w0.135: J1.15@1085.2,1612.8 1086.9,1612.8 1087.3,1612.4 1092,1612.4
  TopLayer w0.2: CAMERA_A2.15@1049.8,1597.4 1050.7,1598.3 1053.3,1598.3 1058.5,1603.5 1072.95,1603.5 1082.25,1612.8 J1.15@1085.2,1612.8 ; CAMERA_A2.15@1049.8,1597.7 ccw(c1049.8,1598.424) 1050.312,1597.912 ccw(c1050.824,1597.4) CAMERA_A2.15@1050.1,1597.4 ; CAMERA_A2.15@1049.8,1597.9 ccw(c1049.8,1599.107) 1050.654,1598.254 ccw(c1051.507,1597.4) CAMERA_A2.15@1050.3,1597.4 ; 1092,1612.4 1092.167,1612.4 1092.5,1612.067 1092.5,1579.666 1097.366,1574.8 1101.4,1574.8 CAMERA_A1.15@1102.8,1573.4
CAMDATA2: CAMERA_A1.14 CAMERA_A2.14 J1.16 | length 102.1
  TopLayer w0.135: 1083.6,1613.2 1087,1613.2 1087.4,1612.8 J1.16@1090.4,1612.8
  TopLayer w0.2: CAMERA_A2.14@1051.8,1599.4 1053.3,1599.4 1057.9,1604 1072.8,1604 1082,1613.2 1083.6,1613.2 ; CAMERA_A2.14@1052.012,1599.188 cw(c1052.524,1598.676) 1052.524,1599.4 cw(c1052.524,1600.124) CAMERA_A2.14@1052.012,1599.612 ; CAMERA_A2.14@1052.154,1599.046 cw(c1053.007,1598.193) 1053.007,1599.4 cw(c1053.007,1600.607) CAMERA_A2.14@1052.154,1599.754 ; J1.16@1090.4,1612.8 1092.351,1612.8 1092.9,1612.251 1092.9,1579.831 1097.531,1575.2 1102.3,1575.2 1103.8,1573.7 1103.8,1572.2 CAMERA_A1.14@1104.8,1571.2 ; CAMERA_A1.14@1104.3,1571.2 ccw(c1103.093,1571.2) 1103.946,1572.054 ccw(c1104.8,1572.907) CAMERA_A1.14@1104.8,1571.7 ; CAMERA_A1.14@1104.5,1571.2 ccw(c1103.776,1571.2) 1104.288,1571.712 ccw(c1104.8,1572.224) CAMERA_A1.14@1104.8,1571.5
CAMDATA3: CAMERA_A1.13 CAMERA_A2.13 J1.17 | length 103.5
  TopLayer w0.12: J1.17@1085.2,1613.6 J1.17@1085.3,1613.6
  TopLayer w0.135: J1.17@1085.3,1613.6 1087.1,1613.6 1087.5,1613.2 1092,1613.2
  TopLayer w0.2: CAMERA_A2.13@1049.8,1599.4 1050.8,1600.4 1053.3,1600.4 1057.4,1604.5 1072.65,1604.5 1081.75,1613.6 J1.17@1085.2,1613.6 ; CAMERA_A2.13@1049.8,1599.7 ccw(c1049.8,1600.424) 1050.312,1599.912 ccw(c1050.824,1599.4) CAMERA_A2.13@1050.1,1599.4 ; CAMERA_A2.13@1049.8,1599.9 ccw(c1049.8,1601.107) 1050.654,1600.254 ccw(c1051.507,1599.4) CAMERA_A2.13@1050.3,1599.4 ; 1092,1613.2 1092.535,1613.2 1093.3,1612.435 1093.3,1579.997 1097.697,1575.6 1102.7,1575.6 CAMERA_A1.13@1104.9,1573.4 ; 1103.734,1574.566 cw(c1102.369,1573.2) CAMERA_A1.13@1104.3,1573.2 ; 1104.076,1574.224 cw(c1103.051,1573.2) CAMERA_A1.13@1104.5,1573.2 ; 1104.417,1573.883 cw(c1103.734,1573.2) CAMERA_A1.13@1104.7,1573.2 ; 1104.459,1573.841 ccw(c1104.8,1574.183) CAMERA_A1.13@1104.8,1573.7